# Altium PCB PCI Express Mini_3000X5095_52PIN_Full-Mini-Type F1.PCBDOC (part 5 of 7)
Units mm, origin at the board's own origin, x right, y up, seen from the top; angles counter-clockwise.
Board outline 70 x 83.2 mm, 6 copper layers (TopLayer, Layer 1, Layer 2, Layer 3, Layer 4, Bottom Layer), stack 1.013 mm thick; 332 components, 213 nets, 1105 pads, 528 vias.
Unrouted connection lines stored in the file: 10.
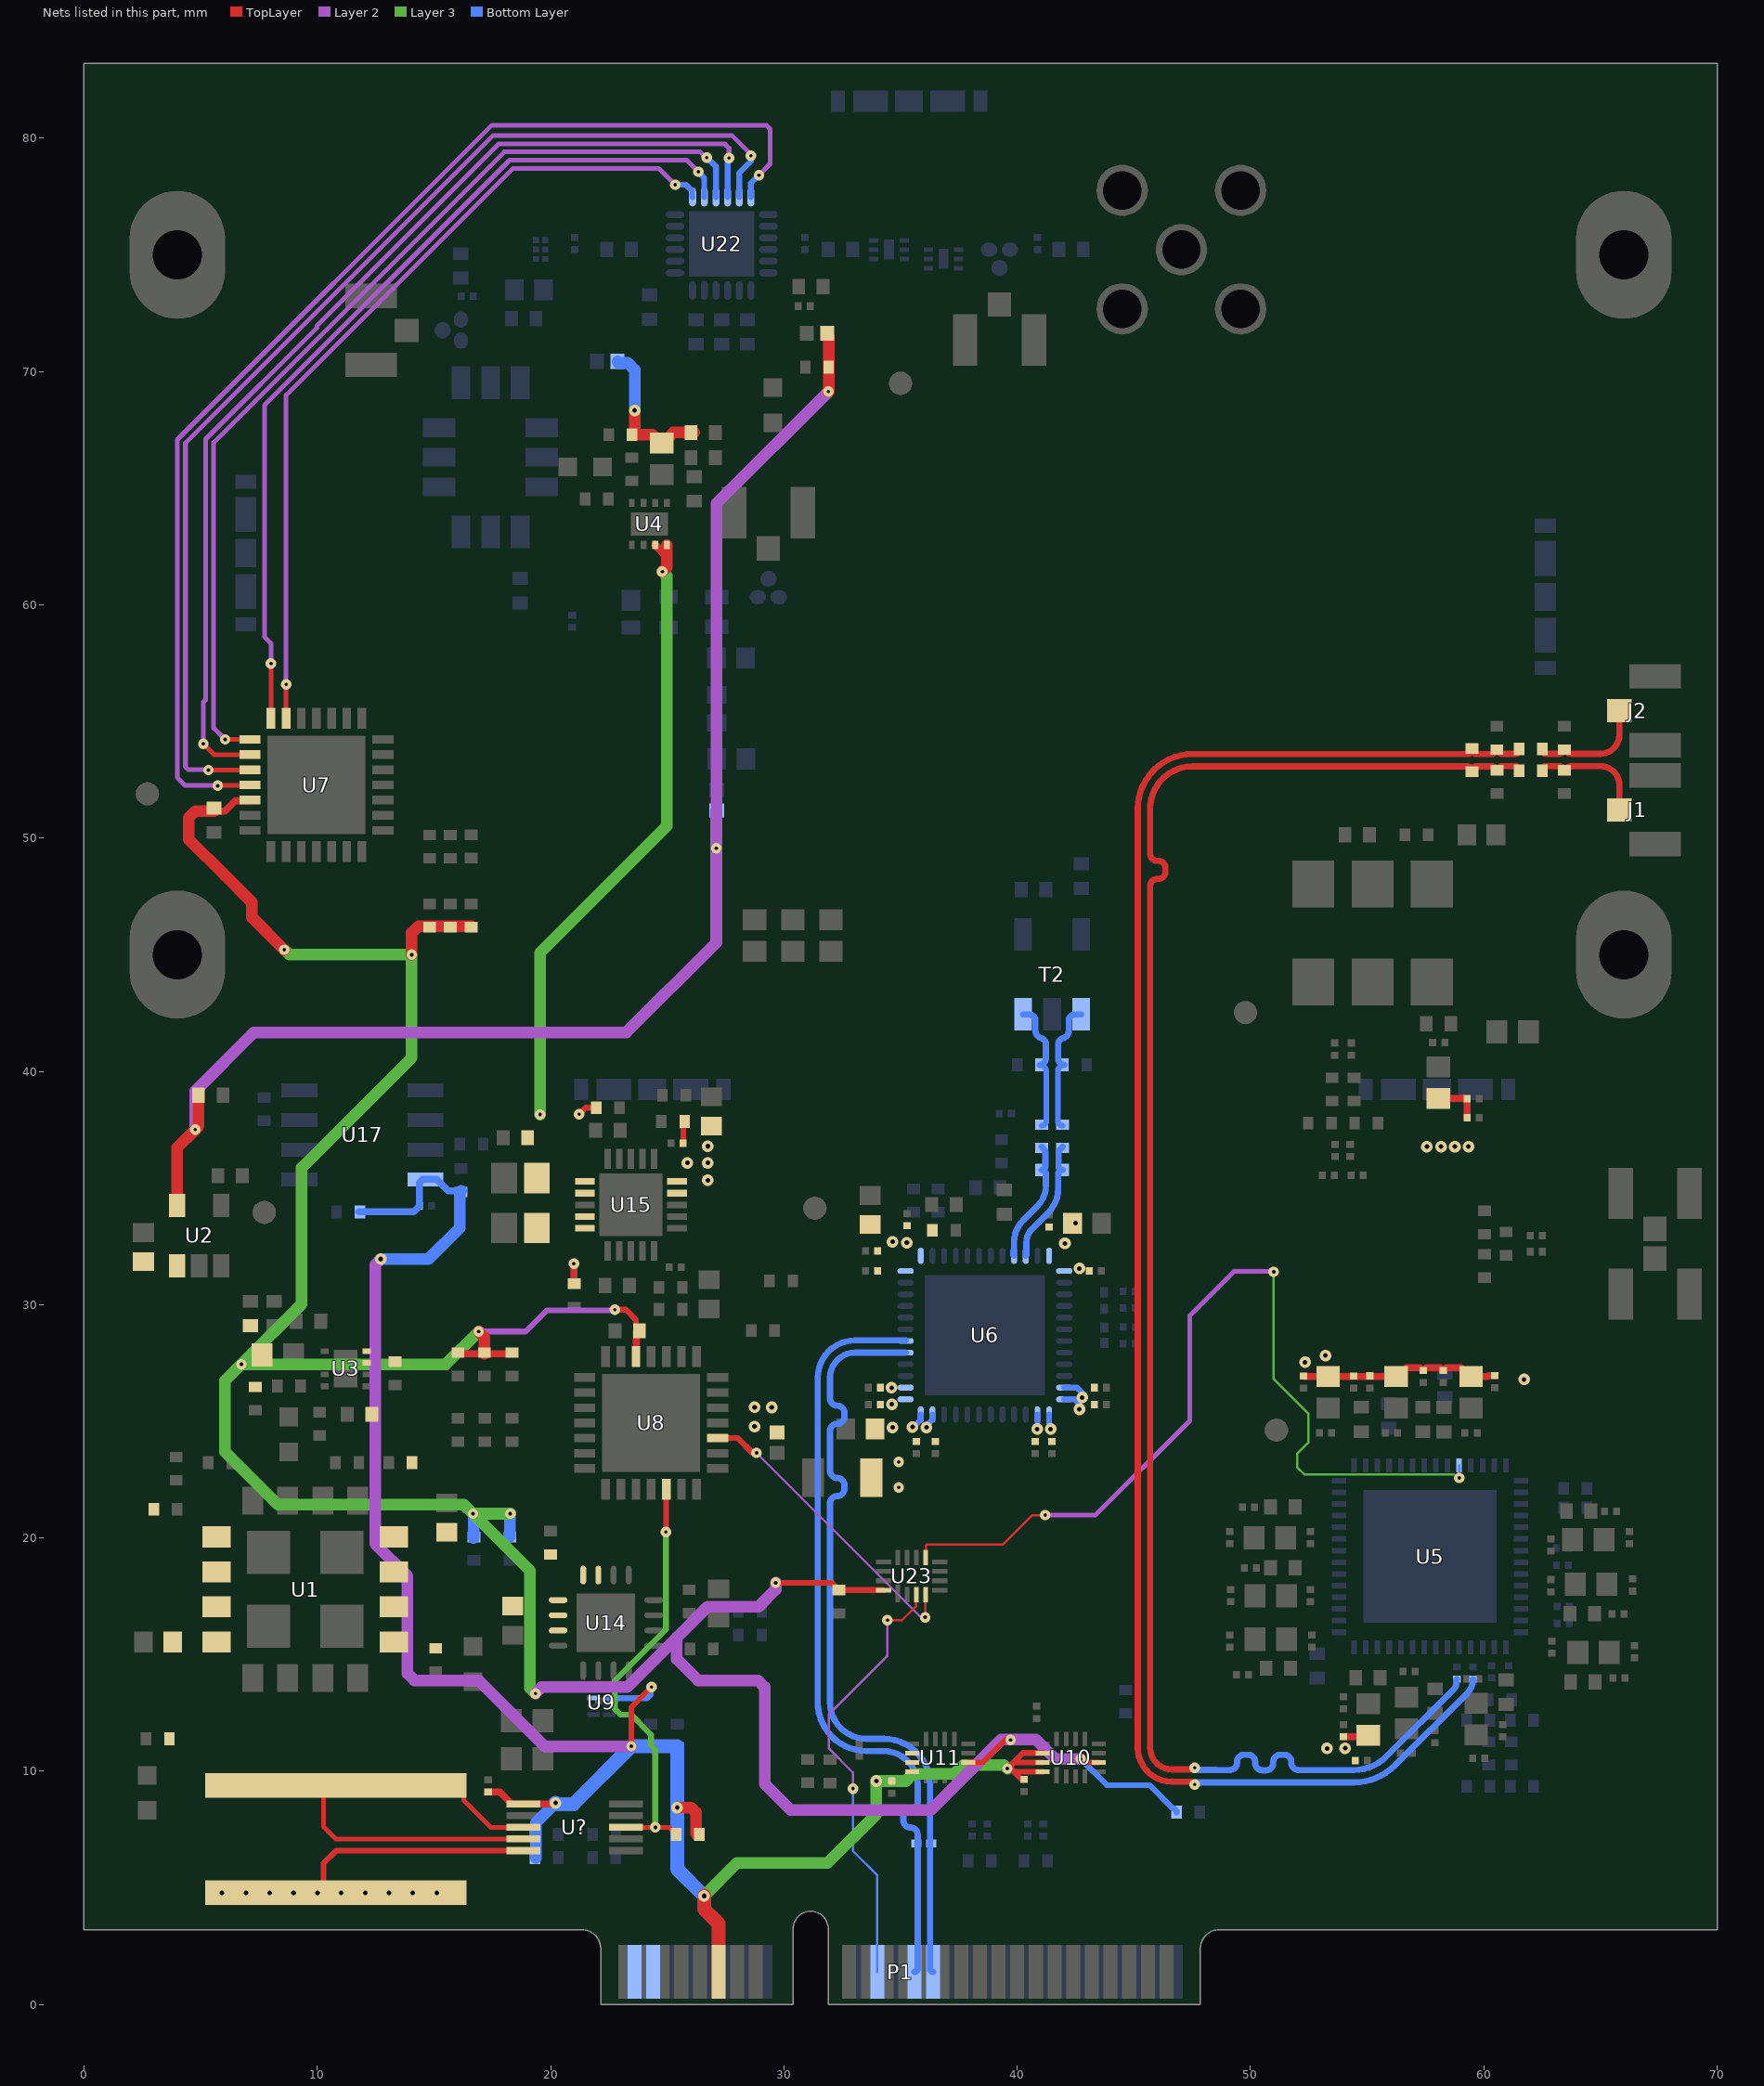
[diagram p6: the nets of this part, all layers, seen from the top]

## Via types
v1: diameter 0.45, hole 0.15, TopLayer to Bottom Layer, tented both sides, 263 vias
v2: diameter 0.5, hole 0.2, TopLayer to Bottom Layer, tented both sides, 200 vias
v3: diameter 0.5, hole 0.2, TopLayer to Bottom Layer, 36 vias
v4: diameter 0.45, hole 0.15, TopLayer to Bottom Layer, 29 vias

## Nets (pads, with @x,y where several pads share a name; then routed paths per layer and width w, separated by ;. In a path a pad name is that pad's centre, name@x,y a point inside that pad or via, vN(x,y) a via of type N, cw(c..) or ccw(c..) an arc to the next point about the centre after c; other vN are vias at no path point) (continued)
ATT_TETRA_V6: (continued)
  Layer 2 w0.2: v1(5.735,52.242) 5.717,52.26 4.332,52.26 4,52.591 4,67.077 17.466,80.543 29.261,80.543 29.413,80.391 29.413,78.899 v1(28.931,78.416)
  Bottom Layer w0.25: U22.24@28.587,77.475 28.587,78.073 v1(28.931,78.416)
CLK_SYNC: P1.20 U23.3 | length 18.9
  TopLayer w0.1: v1(34.44,16.472) 35.065,16.472 35.659,17.066 35.659,17.546 U23.3@35.677,17.564
  Layer 2 w0.1: v1(32.96,9.257) 32.96,9.948 31.934,10.974 31.934,12.449 34.44,14.956 v1(34.44,16.472)
  Bottom Layer w0.1: v1(32.96,9.257) 32.96,6.585 34,5.545 P1.20@34,1.4
CLKin0_N: J1.2 R24.1 R25.2 | length 5.2
  TopLayer w0.267: R24.1@62.459,52.882 cw(c62.664,52.882) 62.664,53.087 63.22,53.087 cw(c63.22,52.855) 63.451,52.855 cw(c63.572,52.855) 63.487,52.94 63.567,53.021 cw(c63.69,52.898) 63.69,53.071 63.762,53.071 cw(c63.792,53.041) 63.792,53.084 64.99,53.084 cw(c64.99,52.259) 65.815,52.259 J1.2@65.815,51.208
CLKin0_P: J2.2 R28.1 R30.1 | length 5.2
  TopLayer w0.267: R30.1@62.459,53.819 ccw(c62.664,53.819) 62.664,53.614 63.228,53.614 ccw(c63.228,53.84) 63.454,53.84 ccw(c63.575,53.84) 63.489,53.755 63.569,53.674 ccw(c63.692,53.797) 63.692,53.624 63.764,53.624 ccw(c63.795,53.654) 63.795,53.611 64.99,53.611 ccw(c64.99,54.436) 65.815,54.436 J2.2@65.815,55.46
CLKin0P_N: C46.2 R24.2 R26.2 R27.2 | length 75.6
  TopLayer w0.267: 46.622,10.079 cw(c46.622,11.005) 45.696,11.005 45.696,47.029 45.696,47.938 cw(c46.006,47.938) 46.006,48.248 46.045,48.248 ccw(c46.045,48.558) 46.355,48.558 46.355,48.713 ccw(c46.045,48.713) 46.045,49.023 46.006,49.023 cw(c46.006,49.333) 45.696,49.333 45.696,50.258 45.696,51.255 cw(c47.517,51.255) 47.517,53.075 59.303,53.075 cw(c59.303,52.889) 59.49,52.889 cw(c59.676,52.889) 59.676,53.075 60.349,53.075 cw(c60.349,52.855) 60.569,52.855 cw(c60.801,52.855) 60.801,53.087 61.354,53.087 cw(c61.354,52.882) R24.2@61.559,52.882
  TopLayer w0.269: 46.622,10.079 47.538,10.079 ccw(c47.538,10.142) v1(47.601,10.142)
  Bottom Layer w0.267: 48.555,10.052 48.607,10.052 48.98,10.052 ccw(c49.053,11.027) 49.053,10.049 49.114,10.049 ccw(c49.114,10.359) 49.424,10.359 49.424,10.399 cw(c49.734,10.399) 49.734,10.709 49.889,10.709 cw(c49.889,10.399) 50.199,10.399 50.199,10.349 ccw(c50.509,10.349) 50.509,10.039 50.664,10.039 ccw(c50.664,10.349) 50.974,10.349 50.974,10.399 cw(c51.284,10.399) 51.284,10.709 51.439,10.709 cw(c51.439,10.399) 51.749,10.399 51.749,10.359 ccw(c52.059,10.359) 52.059,10.049 53.223,10.049 54.43,10.049 ccw(c54.43,12.021) 55.824,10.627 58.713,13.515 ccw(c58.452,13.776) 58.821,13.776 58.821,13.905 cw(c58.877,13.905) 58.837,13.945 C46.2@58.847,13.945
  Bottom Layer w0.269: v1(47.601,10.142) ccw(c47.692,10.142) 47.692,10.052 48.555,10.052
CLKin0P_P: C47.2 R27.1 R29.1 R30.2 | length 75.8
  TopLayer w0.267: 46.622,9.552 cw(c46.622,11.005) 45.169,11.005 45.169,51.255 cw(c47.517,51.255) 47.517,53.602 59.303,53.602 ccw(c59.303,53.789) 59.49,53.789 ccw(c59.676,53.789) 59.676,53.602 60.318,53.602 ccw(c60.318,53.84) 60.556,53.84 ccw(c60.783,53.84) 60.783,53.614 61.354,53.614 ccw(c61.354,53.819) R30.2@61.559,53.819
  TopLayer w0.269: 46.622,9.552 47.374,9.552 cw(c47.375,9.283) 47.444,9.543 cw(c47.378,9.282) v1(47.601,9.432)
  Bottom Layer w0.267: 48.555,9.522 54.432,9.522 ccw(c54.432,12.017) 56.196,10.253 59.29,13.347 ccw(c58.693,13.945) C47.2@59.538,13.945
  Bottom Layer w0.269: v1(47.601,9.432) cw(c47.692,9.432) 47.692,9.522 48.555,9.522